# Altium PCB Sensor.PcbDoc
Units mm, origin at the board's own origin, x right, y up, seen from the top; angles counter-clockwise.
Board outline 24 x 18 mm, 2 copper layers (Top Layer, Bottom Layer); 16 components, 16 nets, 56 pads, 30 vias.
Unrouted connection lines stored in the file: 11.
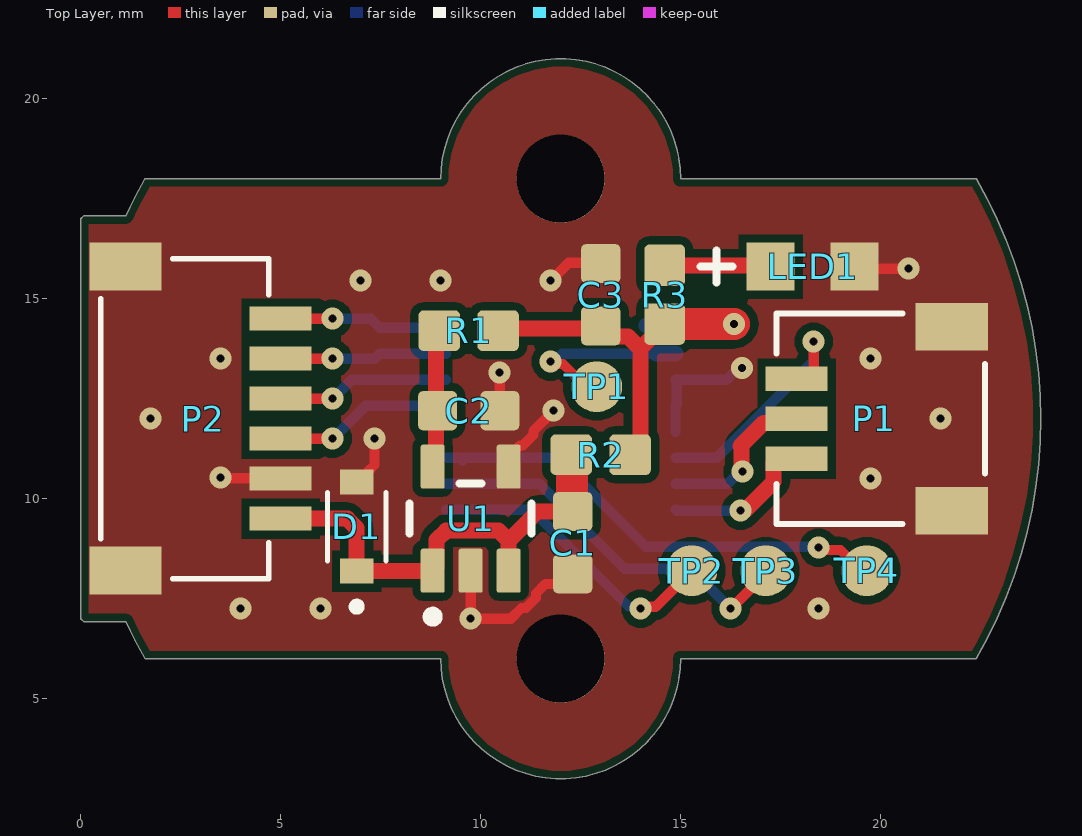
[diagram p0: Top Layer view]
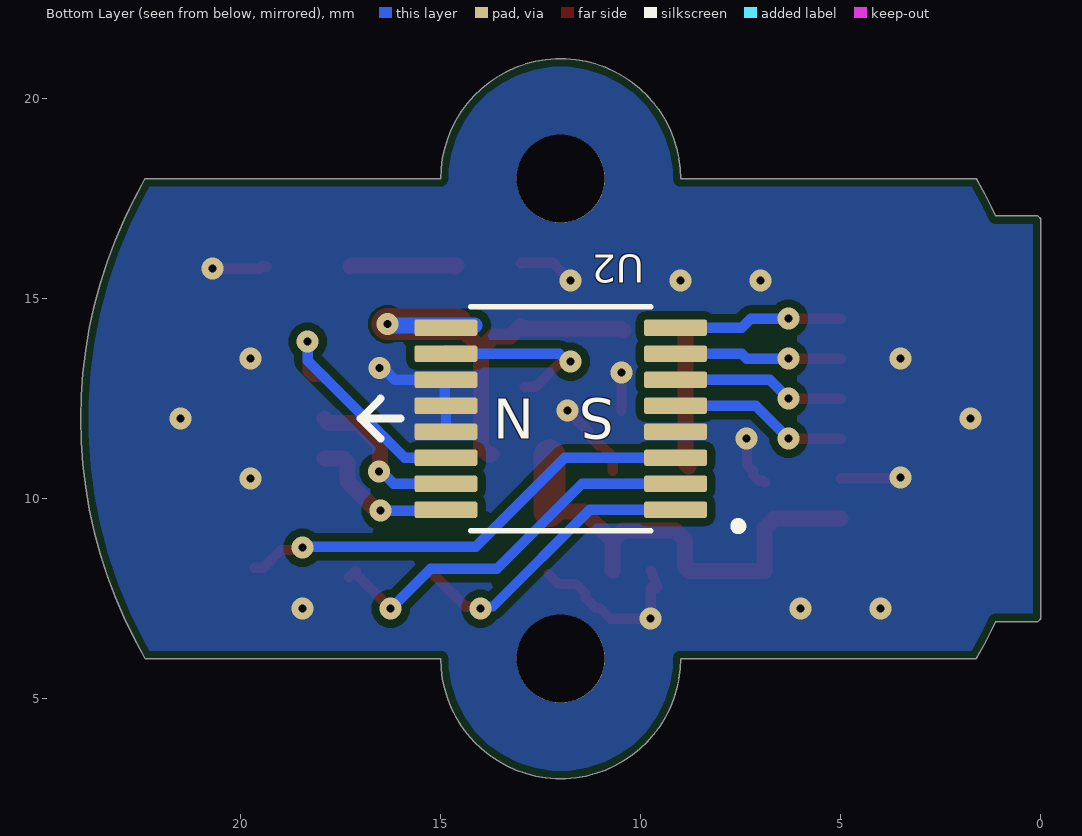
[diagram p1: Bottom Layer view, seen from below]
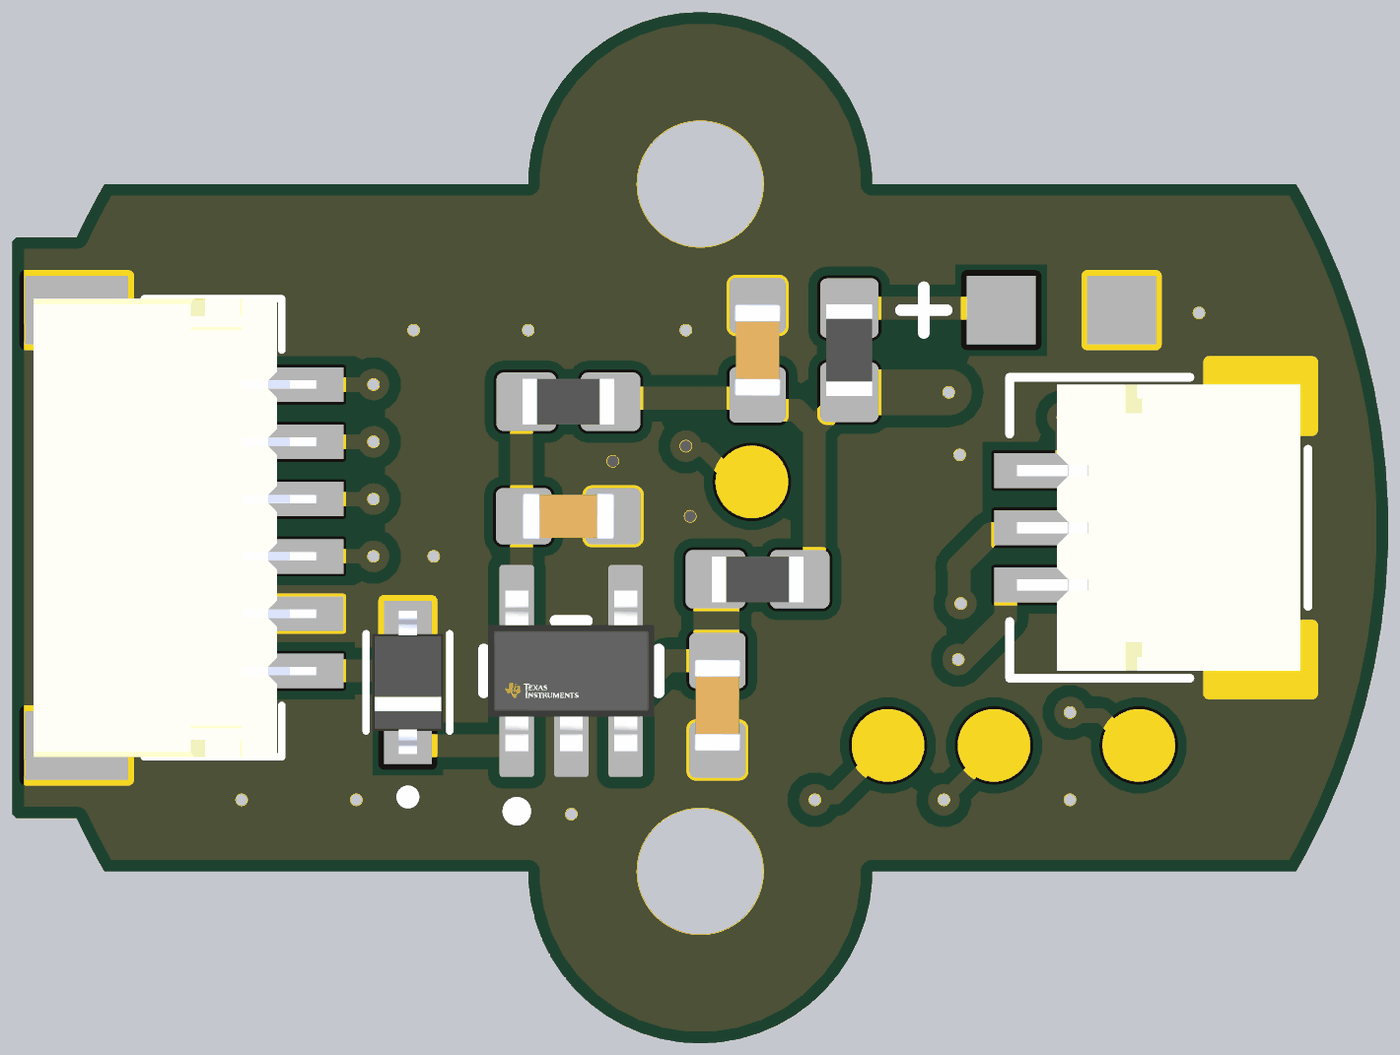
[diagram p2: 3D render of the assembled board from above, using the file's embedded part models]

## Layer stack, top to bottom
Top Solder: solder mask 0.0102, Solder Resist, Dk 3.5
Top Layer: signal copper 0.0356
Dielectric 1: dielectric 0.32, FR-4, Dk 4.8
Bottom Layer: signal copper 0.0356
Bottom Solder: solder mask 0.0102, Solder Resist, Dk 3.5

## Board outline
0.071,6.929 0,7 0,17 0.071,17.071 1.124,17.071 cw(c12,12) 1.608,18 9,18 cw(c12,18) 15,18 22.392,18 cw(c12,12) 24,12 cw(c12,12) 22.392,6 15,6 cw(c12,6) 9,6 1.608,6 cw(c12,12) 1.124,6.929

## Design rules (kind name [scope] priority, off if disabled: settings)
BoardOutlineClearance [All] p1: gap=0.2 ignorepadtopadclearanceinfootprint=FALSE except(0: Arc-SplitContinuation Track-SplitContinuation SMDPad-SplitContinuation THPad-SplitContinuation Via-SplitContinuation Fill-SplitContinuation Poly-SplitContinuation Region-SplitContinuation Text-SplitContinuation)
Clearance [All] p1: gap=0.2 ignorepadtopadclearanceinfootprint=FALSE except(0: Arc-Hole Track-Hole SMDPad-Hole THPad-Hole Via-Hole Fill-Hole Poly-Hole Region-Hole Text-Hole)
PolygonConnect [All] p1: connectstyle=Direct reliefconductorwidth=0.254 reliefentries=4 polygonreliefangle="90 Angle" airgapwidth=0.254
RoutingVias [All] p1: holewidth=0.2 width=0.55 viastyle="Through Hole" minholewidth=0.2 minwidth=0.55 maxholewidth=0.2 maxwidth=0.55
SilkToSolderMaskClearance [IsPad] p1: minsilkscreentomaskgap=0.1 clearancetoexposedcopper=TRUE
SolderMaskExpansion [All] p1: expansion=0.102 istentingtop=FALSE
Width [All] p1: maxlimit=0.8 minlimit=0.254 preferedwidth=0.4 minimp=50.000000 maximp=50.000000 favimp=50.000000
29 further rules are at their usual default settings.

## Components (designator, comment, footprint, x,y, rotation, side; value= is the part's Value field where it differs from the comment)
C1 "1uF" CAPC1608X90N 12.3,8.9 r90 top
C2 "1uF" CAPC1608X90N 9.7,12.2 r180 top
C3 "100nF" CAPC1608X90N 13,15.1 r90 top
D1 "SD05" DIO_MM3Z3V0T1G 6.9,9.3 r90 top
LED1 "0805 Red LED" LED0805 18.3,15.8 r0 top
P1 "SM03B-SRSS-TB" CONN_SM03B-SRSS-TB_JST 20,12 r90 top
P2 "SM06B-SRSS-TB" SM06B-SRSS-TB 3,12 r270 top
R1 "0R" RESC1607X60N 9.7,14.2 r0 top
R2 "0R" RESC1607X60N 13,11.1 r0 top
R3 "1k" RESC1607X60N 14.6,15.1 r270 top
TP1 "50mil TEST_PAD" 15mil_TEST_PAD 12.9,12.8 r0 top
TP2 "50mil TEST_PAD" 15mil_TEST_PAD 15.275,8.2 r0 top
TP3 "50mil TEST_PAD" 15mil_TEST_PAD 17.125,8.2 r0 top
TP4 "50mil TEST_PAD" 15mil_TEST_PAD 19.65,8.2 r0 top
U1 "TPS7A2033PDBVR" FP-DBV0005A-MFG 9.75,9.5 r90 top
U2 "MT6835GT-STD" MT6835GT-STD 12,12 r0 bottom

## Footprints (in the part's own frame and the unit in brackets; to place one, negate y for a bottom-side part, rotate by r counter-clockwise, add the part's x,y. Pads: shape width x height; smd on the part's side, far side on the other; paste and mask are expansions set on the pad)
15mil_TEST_PAD [mm]
  round 1.27 smd paste-2539.97 mask+0.051: 1(0,0)
CAPC1608X90N [mm]
  rrect25% 0.972x0.981 smd mask+0.051: 1(-0.78,0) 2(0.78,0)
  body extent -0.8,-0.4 0.8,0.4, height 0.9
CONN_SM03B-SRSS-TB_JST [mil]
  rect 24x61 smd paste+0 mask+2: 1(-39.37,82.68) 2(0,82.68) 3(39.37,82.68)
  rect 47x71 smd paste-35.5 mask+4: 4(-90.55,-69.88) 5(90.55,-69.88)
  silkscreen extent -103,-102 103,102, body extent -98,-97 98,98, height 116
DIO_MM3Z3V0T1G [mm]
  rect 0.625x0.83 smd: A(1.112,0) K(-1.112,0)
  silkscreen extent -2.1,-0.73 0.85,0.73, body extent -1.25,-0.62 1.25,0.62, height 1
FP-DBV0005A-MFG [mm]
  rrect17% 1.1x0.6 smd paste+0 mask+0: 1(-1.3,0.95) 2(-1.3,0) 3(-1.3,-0.95) 4(1.3,-0.95) 5(1.3,0.95)
  silkscreen extent -2.57,-1.53 0.87,1.53, body extent -1.95,-1.78 1.95,1.78, height 0.25
LED0805 [mm]
  rect 1.2x1.2 smd: 1(-1.05,0) 2(1.05,0)
  silkscreen extent -2.8,-0.4 -2,0.4, body extent -1,-0.65 1,0.65, height 0.8
MT6835GT-STD [mm]
  rrect25% 1.57x0.41 smd mask+0.152: 1(-2.87,2.275) 2(-2.87,1.625) 3(-2.87,0.975) 4(-2.87,0.325) 5(-2.87,-0.325) 6(-2.87,-0.975) 7(-2.87,-1.625) 8(-2.87,-2.275) 9(2.87,-2.275) 10(2.87,-1.625) 11(2.87,-0.975) 12(2.87,-0.325) 13(2.87,0.325) 14(2.87,0.975) 15(2.87,1.625) 16(2.87,2.275)
  silkscreen extent -4.54,-2.8 5,2.8, body extent -3.15,-2.5 3.15,2.5, height 1
RESC1607X60N [mm]
  rrect25% 1.04x1.02 smd mask+0.051: 1(-0.735,0) 2(0.735,0)
  body extent -0.8,-0.4 0.8,0.4, height 0.55
SM06B-SRSS-TB [mm]
  rect 0.6x1.55 smd mask+0.051: 1(-2.5,2) 2(-1.5,2) 3(-0.5,2) 4(0.5,2) 5(1.5,2) 6(2.5,2)
  rect 1.2x1.8 smd: P-MOUNT1(-3.8,-1.875) P-MOUNT2(3.8,-1.875)
  silkscreen extent -4,-2.5 4,1.7, body extent -4,-2.63 4,2.32, height 2.95

## Part data
C1 C2: library part C0603C105K4RACAUTO, "Ceramic Capacitor, Multilayer, Ceramic, 16V, 10% +Tol, 10% -Tol, X7R, 15% TC, 1uF, Surface Mount, 0603", Capacitance=1µF, Case/Package=0603, Dielectric=X7R, Dielectric Material=Ceramic, Manufacturer=KEMET, Max Operating Temperature=125°C, Min Operating Temperature=-55°C, Tolerance=10%, Voltage Rating=16V, Category="Ceramic Capacitors", China RoHS=Compliant, ComponentLink1Description=https://datasheet.octopart.com:443/C0603C105K4RACAUTO-KEMET-datasheet-170281384.pdf?src-supplier=IHS, ComponentLink1URL=https://datasheet.octopart.com:443/C0603C105K4RACAUTO-KEMET-datasheet-170281384.pdf?src-supplier=IHS, ComponentLink2Description=https://datasheet.octopart.com:443/C0603C105K4RACAUTO-KEMET-datasheet-138896278.pdf?src-supplier=Newark, ComponentLink2URL=https://datasheet.octopart.com:443/C0603C105K4RACAUTO-KEMET-datasheet-138896278.pdf?src-supplier=Newark, ComponentLink3Description=https://datasheet.octopart.com:443/C0603C105K4RACAUTO-KEMET-datasheet-153410967.pdf?src-supplier=Electro+Sonic, ComponentLink3URL=https://datasheet.octopart.com:443/C0603C105K4RACAUTO-KEMET-datasheet-153410967.pdf?src-supplier=Electro+Sonic, ComponentLink4Description=https://datasheet.octopart.com/C0603C105K4RACAUTO-KEMET-datasheet-84169754.pdf, ComponentLink4URL=https://datasheet.octopart.com/C0603C105K4RACAUTO-KEMET-datasheet-84169754.pdf, Height=800µm, Length=1.6mm, Lifecycle Status=Production, Manufacturer Part Number=C0603C105K4RACAUTO, Material=Ceramic, Mount="Surface Mount", Number of Terminals=2, Packaging="Tape & Reel", Pricing 1="1=0.12, 10=0.069, 50=0.048, 100=0.0416, 500=0.0309, 1000=0.02761 (USD)", REACH SVHC=Yes, RoHS=Compliant, Schedule B=8532240020, Stock 1=247588, Supplier 1=DigiKey, Voltage Rating (DC)=16V, Width=800µm
C3: library part C0603C104K5RACTU, "Capacitor, Ceramic, Multilayer, 50 V, X7R, 0.1 Uf, Surface Mount, 0603", Case Code (Imperial)=0603, Dielectric=X7R, Dielectric Material=Ceramic, Manufacturer=KEMET, Max Operating Temperature=125°C, Min Operating Temperature=-55°C, Temperature Coefficient=30ppm/°C, Tolerance=10%, Voltage=50V, Capacitance=100nF, Case/Package=0603, Category="Ceramic Capacitors", China RoHS=Compliant, ComponentLink1Description=https://datasheet.octopart.com:443/C0603C104K5RACTU-KEMET-datasheet-178445679.pdf?src-supplier=IHS, ComponentLink1URL=https://datasheet.octopart.com:443/C0603C104K5RACTU-KEMET-datasheet-178445679.pdf?src-supplier=IHS, ComponentLink2Description=https://datasheet.octopart.com:443/C0603C104K5RAC7867-KEMET-datasheet-184792804.pdf?src-supplier=IHS, ComponentLink2URL=https://datasheet.octopart.com:443/C0603C104K5RAC7867-KEMET-datasheet-184792804.pdf?src-supplier=IHS, ComponentLink3Description=https://datasheet.octopart.com:443/C0603C104K5RACTU-KEMET-datasheet-137357759.pdf?src-supplier=Farnell, ComponentLink3URL=https://datasheet.octopart.com:443/C0603C104K5RACTU-KEMET-datasheet-137357759.pdf?src-supplier=Farnell, ComponentLink4Description=https://datasheet.octopart.com:443/C0603C104K5RACTU-KEMET-datasheet-149521864.pdf?src-supplier=Farnell, ComponentLink4URL=https://datasheet.octopart.com:443/C0603C104K5RACTU-KEMET-datasheet-149521864.pdf?src-supplier=Farnell, ComponentLink5Description=https://datasheet.octopart.com:443/C0603C104K5RACTU-KEMET-datasheet-101575654.pdf?src-supplier=Farnell, ComponentLink5URL=https://datasheet.octopart.com:443/C0603C104K5RACTU-KEMET-datasheet-101575654.pdf?src-supplier=Farnell, ComponentLink6Description=https://datasheet.octopart.com:443/C0603C104K5RACTU-KEMET-datasheet-176142159.pdf?src-supplier=Farnell, ComponentLink6URL=https://datasheet.octopart.com:443/C0603C104K5RACTU-KEMET-datasheet-176142159.pdf?src-supplier=Farnell, ComponentLink7Description=https://datasheet.octopart.com:443/C0603C104K5RAC-TU-Kemet-datasheet-7833651.pdf?src-supplier=Farnell, ComponentLink7URL=https://datasheet.octopart.com:443/C0603C104K5RAC-TU-Kemet-datasheet-7833651.pdf?src-supplier=Farnell, ComponentLink8Description=https://datasheet.octopart.com:443/C0603C104K5RAC-TU-Kemet-datasheet-7601896.pdf?src-supplier=Farnell, ComponentLink8URL=https://datasheet.octopart.com:443/C0603C104K5RAC-TU-Kemet-datasheet-7601896.pdf?src-supplier=Farnell, ComponentLink9Description=https://datasheet.octopart.com:443/C0603C104K5RAC-TU-Kemet-datasheet-5316294.pdf?src-supplier=Farnell, ComponentLink9URL=https://datasheet.octopart.com:443/C0603C104K5RAC-TU-Kemet-datasheet-5316294.pdf?src-supplier=Farnell, ComponentLink10Description=https://datasheet.octopart.com:443/C0603C104K5RAC-TU-Kemet-datasheet-5314837.pdf?src-supplier=Farnell, ComponentLink10URL=https://datasheet.octopart.com:443/C0603C104K5RAC-TU-Kemet-datasheet-5314837.pdf?src-supplier=Farnell, ComponentLink11Description=https://datasheet.octopart.com:443/C0603C104K5RAC-TU-Kemet-datasheet-8092359.pdf?src-supplier=Farnell, ComponentLink11URL=https://datasheet.octopart.com:443/C0603C104K5RAC-TU-Kemet-datasheet-8092359.pdf?src-supplier=Farnell, ComponentLink12Description=https://datasheet.octopart.com:443/C0603C104K5RAC-TU-Kemet-datasheet-5314449.pdf?src-supplier=Farnell, ComponentLink12URL=https://datasheet.octopart.com:443/C0603C104K5RAC-TU-Kemet-datasheet-5314449.pdf?src-supplier=Farnell, ComponentLink13Description=https://datasheet.octopart.com:443/C0603C104K5RAC-TU-Kemet-datasheet-5314969.pdf?src-supplier=Farnell, ComponentLink13URL=https://datasheet.octopart.com:443/C0603C104K5RAC-TU-Kemet-datasheet-5314969.pdf?src-supplier=Farnell, ComponentLink14Description=https://datasheet.octopart.com:443/C0603C104K5RAC-TU-Kemet-datasheet-5314627.pdf?src-supplier=Farnell, ComponentLink14URL=https://datasheet.octopart.com:443/C0603C104K5RAC-TU-Kemet-datasheet-5314627.pdf?src-supplier=Farnell, ComponentLink15Description=https://datasheet.octopart.com:443/C0603C104K5RAC-TU-Kemet-datasheet-5389132.pdf?src-supplier=Farnell, ComponentLink15URL=https://datasheet.octopart.com:443/C0603C104K5RAC-TU-Kemet-datasheet-5389132.pdf?src-supplier=Farnell, ComponentLink16Description=https://datasheet.octopart.com:443/C0603C104K5RAC-TU-Kemet-datasheet-5313836.pdf?src-supplier=Farnell, ComponentLink16URL=https://datasheet.octopart.com:443/C0603C104K5RAC-TU-Kemet-datasheet-5313836.pdf?src-supplier=Farnell, ComponentLink17Description=https://datasheet.octopart.com:443/C0603C104K5RAC-TU-Kemet-datasheet-8111010.pdf?src-supplier=Farnell, ComponentLink17URL=https://datasheet.octopart.com:443/C0603C104K5RAC-TU-Kemet-datasheet-8111010.pdf?src-supplier=Farnell, ComponentLink18Description=https://datasheet.octopart.com:443/C0603C104K5RAC-TU-Kemet-datasheet-7627733.pdf?src-supplier=Farnell, ComponentLink18URL=https://datasheet.octopart.com:443/C0603C104K5RAC-TU-Kemet-datasheet-7627733.pdf?src-supplier=Farnell, ComponentLink19Description=https://datasheet.octopart.com:443/C0603C104K5RAC-TU-Kemet-datasheet-5315946.pdf?src-supplier=Farnell, ComponentLink19URL=https://datasheet.octopart.com:443/C0603C104K5RAC-TU-Kemet-datasheet-5315946.pdf?src-supplier=Farnell, ComponentLink20Description=https://datasheet.octopart.com:443/C0603C104K5RACTU-KEMET-datasheet-137357764.pdf?src-supplier=Upverter, ComponentLink20URL=https://datasheet.octopart.com:443/C0603C104K5RACTU-KEMET-datasheet-137357764.pdf?src-supplier=Upverter, ComponentLink21Description=https://datasheet.octopart.com:443/C0603C104K5RAC-TU-Kemet-datasheet-5313890.pdf?src-supplier=Newark, ComponentLink21URL=https://datasheet.octopart.com:443/C0603C104K5RAC-TU-Kemet-datasheet-5313890.pdf?src-supplier=Newark, ComponentLink22Description=https://datasheet.octopart.com:443/C0603C104K5RACTU-Kemet-datasheet-12608295.pdf?src-supplier=Newark, ComponentLink22URL=https://datasheet.octopart.com:443/C0603C104K5RACTU-Kemet-datasheet-12608295.pdf?src-supplier=Newark, ComponentLink23Description=https://datasheet.octopart.com:443/C0603C104K5RACTU-Kemet-datasheet-11992184.pdf?src-supplier=Newark, ComponentLink23URL=https://datasheet.octopart.com:443/C0603C104K5RACTU-Kemet-datasheet-11992184.pdf?src-supplier=Newark, ComponentLink24Description=https://datasheet.octopart.com:443/C0603C104K5RACTU-Kemet-datasheet-10942409.pdf?src-supplier=Newark, ComponentLink24URL=https://datasheet.octopart.com:443/C0603C104K5RACTU-Kemet-datasheet-10942409.pdf?src-supplier=Newark, ComponentLink25Description=https://datasheet.octopart.com:443/C0603C104K5RACTU-Kemet-datasheet-10404442.pdf?src-supplier=Newark, ComponentLink25URL=https://datasheet.octopart.com:443/C0603C104K5RACTU-Kemet-datasheet-10404442.pdf?src-supplier=Newark, ComponentLink26Description=https://datasheet.octopart.com:443/C0603C104K5RAC-TU-Kemet-datasheet-5390537.pdf?src-supplier=Newark, ComponentLink26URL=https://datasheet.octopart.com:443/C0603C104K5RAC-TU-Kemet-datasheet-5390537.pdf?src-supplier=Newark, ComponentLink27Description=https://datasheet.octopart.com:443/C0603C104K5RAC-TU-Kemet-datasheet-7541751.pdf?src-supplier=Newark, ComponentLink27URL=https://datasheet.octopart.com:443/C0603C104K5RAC-TU-Kemet-datasheet-7541751.pdf?src-supplier=Newark, ComponentLink28Description=https://datasheet.octopart.com:443/C0603C104K5RACTU-KEMET-datasheet-171829795.pdf?src-supplier=Newark, ComponentLink28URL=https://datasheet.octopart.com:443/C0603C104K5RACTU-KEMET-datasheet-171829795.pdf?src-supplier=Newark, ComponentLink29Description=https://datasheet.octopart.com:443/C0603C104K5RACTU-Kemet-datasheet-8764837.pdf?src-supplier=Newark, ComponentLink29URL=https://datasheet.octopart.com:443/C0603C104K5RACTU-Kemet-datasheet-8764837.pdf?src-supplier=Newark, ComponentLink30Description=https://datasheet.octopart.com:443/C0603C104K5RACTU-Kemet-datasheet-8480123.pdf?src-supplier=Newark, ComponentLink30URL=https://datasheet.octopart.com:443/C0603C104K5RACTU-Kemet-datasheet-8480123.pdf?src-supplier=Newark, ComponentLink31Description=https://datasheet.octopart.com:443/C0603C104K5RACTU-Kemet-datasheet-5393970.pdf?src-supplier=Newark, ComponentLink31URL=https://datasheet.octopart.com:443/C0603C104K5RACTU-Kemet-datasheet-5393970.pdf?src-supplier=Newark, ComponentLink32Description=https://datasheet.octopart.com:443/C0603C104K5RACTU-Kemet-datasheet-8502025.pdf?src-supplier=Newark, ComponentLink32URL=https://datasheet.octopart.com:443/C0603C104K5RACTU-Kemet-datasheet-8502025.pdf?src-supplier=Newark, ComponentLink33Description=https://datasheet.octopart.com:443/C0603C104K5RACTU-Kemet-datasheet-161801.pdf?src-supplier=Newark, ComponentLink33URL=https://datasheet.octopart.com:443/C0603C104K5RACTU-Kemet-datasheet-161801.pdf?src-supplier=Newark, ComponentLink34Description=https://datasheet.octopart.com:443/C0603C104K5RACTU-Kemet-datasheet-32036385.pdf?src-supplier=Electro+Sonic, ComponentLink34URL=https://datasheet.octopart.com:443/C0603C104K5RACTU-Kemet-datasheet-32036385.pdf?src-supplier=Electro+Sonic, ComponentLink35Description=https://datasheet.octopart.com:443/C0603C104K5RACTU-KEMET-datasheet-157246124.pdf?src-supplier=Electro+Sonic, ComponentLink35URL=https://datasheet.octopart.com:443/C0603C104K5RACTU-KEMET-datasheet-157246124.pdf?src-supplier=Electro+Sonic, ComponentLink36Description=https://datasheet.octopart.com:443/C0603C104K5RACTU-KEMET-datasheet-164512540.pdf?src-supplier=TME, ComponentLink36URL=https://datasheet.octopart.com:443/C0603C104K5RACTU-KEMET-datasheet-164512540.pdf?src-supplier=TME, ComponentLink37Description=https://datasheet.octopart.com:443/C0603C104K5RACTU-Kemet-datasheet-67830781.pdf?src-supplier=TME, ComponentLink37URL=https://datasheet.octopart.com:443/C0603C104K5RACTU-Kemet-datasheet-67830781.pdf?src-supplier=TME, ComponentLink38Description=https://datasheet.octopart.com:443/C0603C104K5RACTU-KEMET-datasheet-68331906.pdf?src-supplier=TME, ComponentLink38URL=https://datasheet.octopart.com:443/C0603C104K5RACTU-KEMET-datasheet-68331906.pdf?src-supplier=TME, ComponentLink39Description=https://datasheet.octopart.com:443/C0603C104K5RAC7867-Kemet-datasheet-62098571.pdf?src-supplier=TME, ComponentLink39URL=https://datasheet.octopart.com:443/C0603C104K5RAC7867-Kemet-datasheet-62098571.pdf?src-supplier=TME, ComponentLink40Description=https://datasheet.octopart.com:443/C0603C104K5RAC7867-Kemet-datasheet-17577222.pdf?src-supplier=TME, ComponentLink40URL=https://datasheet.octopart.com:443/C0603C104K5RAC7867-Kemet-datasheet-17577222.pdf?src-supplier=TME, ComponentLink41Description=https://datasheet.octopart.com:443/C0603C104K5RACTU-KEMET-datasheet-110724412.pdf?src-supplier=RS+(Formerly+Allied+Electronics), ComponentLink41URL=https://datasheet.octopart.com:443/C0603C104K5RACTU-KEMET-datasheet-110724412.pdf?src-supplier=RS+(Formerly+Allied+Electronics), ComponentLink42Description=https://datasheet.octopart.com:443/C0603C104K5RACTU-Kemet-datasheet-464.pdf?src-supplier=RS+(Formerly+Allied+Electronics), ComponentLink42URL=https://datasheet.octopart.com:443/C0603C104K5RACTU-Kemet-datasheet-464.pdf?src-supplier=RS+(Formerly+Allied+Electronics), ComponentLink43Description=https://datasheet.octopart.com/C0603C104K5RACTU-KEMET-datasheet-84169754.pdf, ComponentLink43URL=https://datasheet.octopart.com/C0603C104K5RACTU-KEMET-datasheet-84169754.pdf, ComponentLink44Description=https://datasheet.octopart.com:443/C0603C104K5RACTU-Kemet-datasheet-24570007.pdf?src-supplier=element14+APAC, ComponentLink44URL=https://datasheet.octopart.com:443/C0603C104K5RACTU-Kemet-datasheet-24570007.pdf?src-supplier=element14+APAC, ComponentLink45Description=https://datasheet.octopart.com:443/C0603C104K5RACTU-Kemet-datasheet-22084244.pdf?src-supplier=element14+APAC, ComponentLink45URL=https://datasheet.octopart.com:443/C0603C104K5RACTU-Kemet-datasheet-22084244.pdf?src-supplier=element14+APAC, ComponentLink46Description=https://datasheet.octopart.com:443/C0603C104K5RACTU-Kemet-datasheet-21389238.pdf?src-supplier=element14+APAC, ComponentLink46URL=https://datasheet.octopart.com:443/C0603C104K5RACTU-Kemet-datasheet-21389238.pdf?src-supplier=element14+APAC, ComponentLink47Description=https://datasheet.octopart.com:443/C0603C104K5RACTU-Kemet-datasheet-11723057.pdf?src-supplier=Arrow+Electronics, ComponentLink47URL=https://datasheet.octopart.com:443/C0603C104K5RACTU-Kemet-datasheet-11723057.pdf?src-supplier=Arrow+Electronics, ComponentLink48Description=https://datasheet.octopart.com:443/C0603C104K5RAC7867-KEMET-datasheet-164857143.pdf?src-supplier=Burklin+Elektronik, ComponentLink48URL=https://datasheet.octopart.com:443/C0603C104K5RAC7867-KEMET-datasheet-164857143.pdf?src-supplier=Burklin+Elektronik, ComponentLink49Description=https://datasheet.octopart.com:443/C0603C104K5RAC-TU-Kemet-datasheet-8187850.pdf?src-supplier=Jameco, ComponentLink49URL=https://datasheet.octopart.com:443/C0603C104K5RAC-TU-Kemet-datasheet-8187850.pdf?src-supplier=Jameco, ComponentLink50Description=https://datasheet.octopart.com:443/C0603C104K5RACTU-Kemet-datasheet-122295.pdf?src-supplier=DigiKey, ComponentLink50URL=https://datasheet.octopart.com:443/C0603C104K5RACTU-Kemet-datasheet-122295.pdf?src-supplier=DigiKey, Contact Plating=Tin, Depth=800µm, Dissipation Factor=2.5%, Height=800µm, Lead Free="Lead Free", Lead Pitch=700µm, Length=1.6mm, Lifecycle Status=Production, Manufacturer Part Number=C0603C104K5RACTU, Material=Ceramic, Mount="Surface Mount", Number of Pins=2, Number of Terminals=2, Packaging="Tape & Reel", Pricing 1="1=0.08, 10=0.011 (USD)", Radiation Hardening=No, REACH SVHC=Yes, RoHS=Compliant, Schedule B="8532240020, 8532240020|8532240020, 8532240020|8532240020|8532240020, 8532240020|8532240020|8532240020|8532240020", Stock 1=6705630, Supplier 1=DigiKey, Termination=SMD/SMT, Thickness=863.6µm, Voltage Rating=50V, Voltage Rating (DC)=50V, Width=800µm
D1: "Trans Voltage Suppressor Diode, 350W, 5V V(RWM), Unidirectional, 1 Element, Silicon", Clamping Voltage=14.5V, Manufacturer="Sangdest Microelectronics", Max Operating Temperature=125°C, Min Breakdown Voltage=6V, Min Operating Temperature=-55°C, Peak Pulse Power=350W, Peak Reverse Current=10µA, Reverse Standoff Voltage=5V, Supplier Part Number 1=1655-SD05CT-ND, Category="TVS Diodes", ComponentLink1Description=https://datasheet.octopart.com:443/SD05-SMC-Diode-Solutions-datasheet-181400473.pdf?src-supplier=IHS, ComponentLink1URL=https://datasheet.octopart.com:443/SD05-SMC-Diode-Solutions-datasheet-181400473.pdf?src-supplier=IHS, Lifecycle Status=Production, Manufacturer Part Number=SD05, Number of Elements=1, Number of Terminals=2, Polarity=Unidirectional, Pricing 1="1=0.27, 10=0.165, 100=0.1025, 500=0.0752, 1000=0.06636 (USD)", REACH SVHC=Yes, RoHS=Compliant, Stock 1=13210, Supplier 1=DigiKey
LED1: library part "LS R976-NR-1-0-20-R18", "LED Uni-Color Red 645nm 2-Pin Chip 0805(2012Metric) T/R", Manufacturer="Osram Opto", Supplier Part Number 1=475-LSR976-NR-1CT-ND, Category=LEDs, Manufacturer Part Number="LS R976-NR-1-0-20-R18", Pricing 1="1=0.15, 10=0.102, 100=0.0704, 500=0.05582, 1000=0.05095, 2000=0.04679 (USD)", Schedule B="8541402000, 8541402000|8541402000, 8541402000|8541402000|8541402000, 8541402000|8541402000|8541402000|8541402000", Stock 1=110240, Supplier 1=DigiKey
P1: "Board Connector, 3 Contact(s), 1 Row(s), Male, Right Angle, Surface Mount Terminal", Color=Natural, Manufacturer=JST, Max Operating Temperature=85°C, Min Operating Temperature=-25°C, Category="Card Edge Connectors", ComponentLink1Description=https://datasheet.octopart.com:443/SM03B-SRSS-TB-JST-datasheet-180492086.pdf?src-supplier=IHS, ComponentLink1URL=https://datasheet.octopart.com:443/SM03B-SRSS-TB-JST-datasheet-180492086.pdf?src-supplier=IHS, ComponentLink2Description=https://datasheet.octopart.com:443/SM03B-SRSS-TB-JST-datasheet-44103209.pdf?src-supplier=TME, ComponentLink2URL=https://datasheet.octopart.com:443/SM03B-SRSS-TB-JST-datasheet-44103209.pdf?src-supplier=TME, ComponentLink3Description=https://datasheet.octopart.com:443/SM03B-SRSS-TB-JST-datasheet-118603.pdf?src-supplier=DigiKey, ComponentLink3URL=https://datasheet.octopart.com:443/SM03B-SRSS-TB-JST-datasheet-118603.pdf?src-supplier=DigiKey, ComponentLink4Description=https://datasheet.octopart.com:443/SM03B-SRSS-TB-JST-datasheet-152738602.pdf?src-supplier=Amar+Radio+Corporation, ComponentLink4URL=https://datasheet.octopart.com:443/SM03B-SRSS-TB-JST-datasheet-152738602.pdf?src-supplier=Amar+Radio+Corporation, Connector Type="Male Pin", Contact Gender=Male, Contact Plating=Tin, Housing Color=Natural, Housing Material=Nylon, Lead Free="Contains Lead", Lifecycle Status=Obsolete, Manufacturer Part Number=SM03B-SRSS-TB, Mount="Surface Mount", Number of Contacts=3, Number of Pins=3, Number of Positions=3, Number of Rows=1, Orientation=Horizontal, Pitch=990.6µm, Pricing 1="1=0.44, 10=0.373, 100=0.317, 500=0.2829, 1000=0.26938 (USD)", RoHS=Compliant, Stock 1=14167, Supplier 1=DigiKey, Terminal Pitch=1mm, Termination=Solder
P2: "Board Connector, 6 Contact(s), 1 Row(s), Male, Right Angle, 0.039 inch Pitch, Surface Mount Terminal", Color=Natural, Dielectric Material=Polyamide, Manufacturer=JST, Max Operating Temperature=85°C, Min Operating Temperature=-25°C, Category="Card Edge Connectors", ComponentLink1Description=https://datasheet.octopart.com:443/SM06B-SRSS-TB-JST-datasheet-118603.pdf?src-supplier=Upverter, ComponentLink1URL=https://datasheet.octopart.com:443/SM06B-SRSS-TB-JST-datasheet-118603.pdf?src-supplier=Upverter, ComponentLink2Description=https://datasheet.octopart.com:443/SM06B-SRSS-TB-JST-datasheet-180492086.pdf?src-supplier=IHS, ComponentLink2URL=https://datasheet.octopart.com:443/SM06B-SRSS-TB-JST-datasheet-180492086.pdf?src-supplier=IHS, ComponentLink3Description=https://datasheet.octopart.com:443/SM06B-SRSS-TB-JST-datasheet-44103209.pdf?src-supplier=TME, ComponentLink3URL=https://datasheet.octopart.com:443/SM06B-SRSS-TB-JST-datasheet-44103209.pdf?src-supplier=TME, ComponentLink4Description=https://datasheet.octopart.com:443/SM06B-SRSS-TB-JST-datasheet-152738602.pdf?src-supplier=Amar+Radio+Corporation, ComponentLink4URL=https://datasheet.octopart.com:443/SM06B-SRSS-TB-JST-datasheet-152738602.pdf?src-supplier=Amar+Radio+Corporation, Connector Type="Male Pin", Contact Gender=Male, Contact Plating=Tin, Housing Color=Natural, Housing Material=Nylon, Lead Free="Contains Lead", Lifecycle Status=Obsolete, Manufacturer Package Identifier=SM06B-SRSS-TB, Manufacturer Part Number=SM06B-SRSS-TB, Mount="Surface Mount", Number of Contacts=6, Number of Pins=6, Number of Positions=6, Number of Rows=1, Orientation=Horizontal, Pitch=990.6µm, Pricing 1="1=0.67, 10=0.567, 100=0.4821, 500=0.43024, 1000=0.40969 (USD)", RoHS=Compliant, Stock 1=26532, Supplier 1=DigiKey, Terminal Pitch=1mm, Termination=Solder
R1 R2: library part RC0402JR-070RL, "GENERAL PURPOSE CHIP RESISTOR Metal Glaze/thick Film, 0.0625W, 0ohm, Surface Mount, 0402", Case Code (Imperial)=0402, Manufacturer="Yageo Group", Max Operating Temperature=155°C, Max Power Dissipation=63mW, Min Operating Temperature=-55°C, Power Dissipation=62.5mW, Resistance=0Ω, Supplier Part Number 1=311-0.0JRTR-ND, Temperature Coefficient=200ppm/°C, Tolerance=5%, Voltage Rating=50V, Case/Package=0402, Category="Chip SMD Resistors", China RoHS=Non-Compliant, ComponentLink1Description=https://datasheet.octopart.com:443/RC0402JR-070RL-Yageo-datasheet-182189538.pdf?src-supplier=IHS, ComponentLink1URL=https://datasheet.octopart.com:443/RC0402JR-070RL-Yageo-datasheet-182189538.pdf?src-supplier=IHS, ComponentLink2Description=https://datasheet.octopart.com:443/RC0402JR-070RL-Yageo-datasheet-10408619.pdf?src-supplier=Newark, ComponentLink2URL=https://datasheet.octopart.com:443/RC0402JR-070RL-Yageo-datasheet-10408619.pdf?src-supplier=Newark, ComponentLink3Description=https://datasheet.octopart.com:443/RC0402JR-070RL-Yageo-datasheet-12531192.pdf?src-supplier=Seeed+Studio, ComponentLink3URL=https://datasheet.octopart.com:443/RC0402JR-070RL-Yageo-datasheet-12531192.pdf?src-supplier=Seeed+Studio, ComponentLink4Description=https://datasheet.octopart.com:443/RC0402JR-070RL-Yageo-datasheet-8324527.pdf?src-supplier=TME, ComponentLink4URL=https://datasheet.octopart.com:443/RC0402JR-070RL-Yageo-datasheet-8324527.pdf?src-supplier=TME, ComponentLink5Description=https://datasheet.octopart.com:443/RC0402JR-070RL-Yageo-datasheet-62067350.pdf?src-supplier=Farnell, ComponentLink5URL=https://datasheet.octopart.com:443/RC0402JR-070RL-Yageo-datasheet-62067350.pdf?src-supplier=Farnell, ComponentLink6Description=https://datasheet.octopart.com:443/RC0402JR-070RL-Yageo-datasheet-8329306.pdf?src-supplier=element14, ComponentLink6URL=https://datasheet.octopart.com:443/RC0402JR-070RL-Yageo-datasheet-8329306.pdf?src-supplier=element14, ComponentLink7Description=https://datasheet.octopart.com:443/RC0402JR-070RL-Yageo-datasheet-505231.pdf?src-supplier=element14, ComponentLink7URL=https://datasheet.octopart.com:443/RC0402JR-070RL-Yageo-datasheet-505231.pdf?src-supplier=element14, ComponentLink8Description=https://datasheet.octopart.com:443/RC0402JR-070RL-Yageo-datasheet-175423674.pdf?src-supplier=SOS+electronic, ComponentLink8URL=https://datasheet.octopart.com:443/RC0402JR-070RL-Yageo-datasheet-175423674.pdf?src-supplier=SOS+electronic, ComponentLink9Description=https://datasheet.octopart.com:443/RC0402JR-070RL-Yageo-datasheet-164759695.pdf?src-supplier=Future+Electronics, ComponentLink9URL=https://datasheet.octopart.com:443/RC0402JR-070RL-Yageo-datasheet-164759695.pdf?src-supplier=Future+Electronics, ComponentLink10Description=https://datasheet.octopart.com:443/RC0402JR-070RL-Yageo-datasheet-137700087.pdf?src-supplier=Future+Electronics, ComponentLink10URL=https://datasheet.octopart.com:443/RC0402JR-070RL-Yageo-datasheet-137700087.pdf?src-supplier=Future+Electronics, ComponentLink11Description=https://datasheet.octopart.com/RC0402JR-070RL-Yageo-datasheet-73766026.pdf, ComponentLink11URL=https://datasheet.octopart.com/RC0402JR-070RL-Yageo-datasheet-73766026.pdf, ComponentLink12Description=http://sigma.octopart.com:80/rohs_statement/Yageo-company-2.pdf?src-supplier=Compliance+Statements, ComponentLink12URL=http://sigma.octopart.com:80/rohs_statement/Yageo-company-2.pdf?src-supplier=Compliance+Statements, ComponentLink13Description=http://sigma.octopart.com:80/conflict_mineral_statement/Yageo-company-3.pdf?src-supplier=Compliance+Statements, ComponentLink13URL=http://sigma.octopart.com:80/conflict_mineral_statement/Yageo-company-3.pdf?src-supplier=Compliance+Statements, Composition="Thick Film", Contact Plating=Tin, Depth=500µm, Features="Moisture Resistant", Height=350µm, Lead Free="Lead Free", Length=1mm, Lifecycle Status=Production, Manufacturer Part Number=RC0402JR-070RL, Military Standard=Not, Mount="Surface Mount", Number of Pins=2, Number of Terminals=2, Number of Terminations=2, Packaging="Tape & Reel", Power Rating=63mW, Pricing 1="10000=0.00206, 20000=0.00185, 30000=0.00175, 50000=0.00163, 70000=0.00155, 100000=0.00148, 120000=0.00145, 240000=0.00134, 250000=0.00133 (USD)", Radiation Hardening=No, REACH SVHC=Yes, RoHS=Compliant, Schedule B="8533290000, 8533290000|8533290000, 8533290000|8533290000|8533290000, 8533290000|8533290000|8533290000|8533290000", Stock 1=19862441, Supplier 1=DigiKey, Termination=SMD/SMT, Voltage Rating (DC)=50V, Width=500µm
R3: library part RNCP0603FTD1K00, "Fixed Resistor, Thin Film, 0.125W, 1000ohm, 150V, 1% +/-Tol, 100ppm/Cel, Surface Mount, 0603", Case Code (Imperial)=0603, Case Code (Metric)=1608, Manufacturer="Stackpole Electronics", Max Operating Temperature=155°C, Max Power Dissipation=125mW, Min Operating Temperature=-55°C, Resistance=1kΩ, Temperature Coefficient=100ppm/°C, Tolerance=1%, Voltage Rating=150V, Case/Package=0603, Category="Chip SMD Resistors", ComponentLink1Description=https://datasheet.octopart.com:443/RNCP0603FTD1K00-Stackpole-Electronics-datasheet-182148179.pdf?src-supplier=IHS, ComponentLink1URL=https://datasheet.octopart.com:443/RNCP0603FTD1K00-Stackpole-Electronics-datasheet-182148179.pdf?src-supplier=IHS, ComponentLink2Description=https://datasheet.octopart.com:443/RNCP0603FTD1K00-Stackpole-Electronics-datasheet-149178200.pdf?src-supplier=Upverter, ComponentLink2URL=https://datasheet.octopart.com:443/RNCP0603FTD1K00-Stackpole-Electronics-datasheet-149178200.pdf?src-supplier=Upverter, ComponentLink3Description=https://datasheet.octopart.com:443/RNCP0603FTD1K00-Stackpole-Electronics-datasheet-141193801.pdf?src-supplier=Stackpole+Electronics, ComponentLink3URL=https://datasheet.octopart.com:443/RNCP0603FTD1K00-Stackpole-Electronics-datasheet-141193801.pdf?src-supplier=Stackpole+Electronics, ComponentLink4Description=https://datasheet.octopart.com:443/RNCP0603FTD1K00-Stackpole-Electronics-datasheet-38896780.pdf?src-supplier=Stackpole+Electronics, ComponentLink4URL=https://datasheet.octopart.com:443/RNCP0603FTD1K00-Stackpole-Electronics-datasheet-38896780.pdf?src-supplier=Stackpole+Electronics, ComponentLink5Description=https://datasheet.octopart.com:443/RNCP0603FTD1K00-Stackpole-Electronics-datasheet-33021030.pdf?src-supplier=Future+Electronics, ComponentLink5URL=https://datasheet.octopart.com:443/RNCP0603FTD1K00-Stackpole-Electronics-datasheet-33021030.pdf?src-supplier=Future+Electronics, ComponentLink6Description=https://datasheet.octopart.com:443/RNCP0603FTD1K00-Stackpole-Electronics-datasheet-12527267.pdf?src-supplier=Future+Electronics, ComponentLink6URL=https://datasheet.octopart.com:443/RNCP0603FTD1K00-Stackpole-Electronics-datasheet-12527267.pdf?src-supplier=Future+Electronics, ComponentLink7Description=http://sigma.octopart.com:80/15942470/materials_sheet/Stackpole-Electronics-RNCP0603FTD1K00.pdf?src-supplier=Compliance+Statements, ComponentLink7URL=http://sigma.octopart.com:80/15942470/materials_sheet/Stackpole-Electronics-RNCP0603FTD1K00.pdf?src-supplier=Compliance+Statements, ComponentLink8Description=http://sigma.octopart.com:80/141158211/reach_statement/Stackpole-Electronics-RNCP0603FTD1K00.pdf?src-supplier=Compliance+Statements, ComponentLink8URL=http://sigma.octopart.com:80/141158211/reach_statement/Stackpole-Electronics-RNCP0603FTD1K00.pdf?src-supplier=Compliance+Statements, ComponentLink9Description=http://sigma.octopart.com:80/141158212/rohs_statement/Stackpole-Electronics-RNCP0603FTD1K00.pdf?src-supplier=Compliance+Statements, ComponentLink9URL=http://sigma.octopart.com:80/141158212/rohs_statement/Stackpole-Electronics-RNCP0603FTD1K00.pdf?src-supplier=Compliance+Statements, Composition="Thin Film", Features="Anti-Sulfur, Moisture Resistant", Height=400µm, Length=1.4986mm, Lifecycle Status=Production, Manufacturer Part Number=RNCP0603FTD1K00, Mount="Surface Mount", Number of Terminals=2, Number of Terminations=2, Packaging=Digi-Reel®, Power Dissipation=125mW, Power Rating=125mW, Pricing 1="1=0.1, 10=0.010, 25=0.010, 50=0.0096, 100=0.0089, 250=0.0084, 500=0.00792 (USD)", REACH SVHC=Yes, RoHS=Compliant, Schedule B="8533210045, 8533210045|8533210045, 8533210045|8533210045|8533210045, 8533210045|8533210045|8533210045|8533210045", Stock 1=341429, Supplier 1=DigiKey, Width=800µm, Working Voltage=150V
TP1 TP2 TP3 TP4: library part "15mil TEST_PAD"
U1: "300mA ultra-low-noise low-IQ low-dropout (LDO) linear regulator with high PSRR 5-SOT-23 -40 to 125", Case/Package=SOT-23-5, Dropout Voltage=145mV, Manufacturer="Texas Instruments", Manufacturer Lifecycle Status=ACTIVE, Max Junction Temperature (Tj)=125°C, Max Supply Voltage=6V, Min Operating Temperature=-40°C, Min Supply Voltage=1.6V, Nominal Supply Current=6.5µA, Output Current=300mA, Output Voltage=3.3V, Supplier Part Number 1=296-TPS7A2033PDBVRDKR-ND, Accuracy=1.5%, Category="LDO Voltage Regulators", ComponentLink1Description=https://sigma.octopart.com:443/177332311/technical_drawing/Texas-Instruments-TPS7A2033PDBVR.pdf?src-supplier=Texas+Instruments, ComponentLink1URL=https://sigma.octopart.com:443/177332311/technical_drawing/Texas-Instruments-TPS7A2033PDBVR.pdf?src-supplier=Texas+Instruments, ComponentLink2Description=https://octopart.com:443/opatz8j6/c1?t=jI4MJxUHNHWPLUTUjPFE_I4nFT9ogQQS70wFg6iEODFO8LbYHvqBDKPBMlDtEwO4fNGI88ubVwCkCjf0m79oYyvw0lNgXSr_kQlB_nshs-lDL0gpQEt062WpfwVbrY7aMcaNfk_VYcVu1c5ZyMHT8tYLznoJcMs0V3cIKOpV8FkTUbmZxBhaArT7MSQXB5rB175PQ9HeqkODOBcAb5uxQ4pXmdIRVFW0nHjT5bbTxbLCkHYQ6wSbjOTmjpzrmMdRq376bhW5SzS0L0ZYTijf2l1mplZ7KrrI9CUmQvcyMNcVPe6befGlNnr1fDH3Q5Ss6aSm6FD-UpaqOnEuIpR4XaVo6xK0ksEziWk1rzqOuekfSo_fNioOtoDqTgyhaxobMR58zb0N&src-supplier=Texas+Instruments, ComponentLink2URL=https://octopart.com:443/opatz8j6/c1?t=jI4MJxUHNHWPLUTUjPFE_I4nFT9ogQQS70wFg6iEODFO8LbYHvqBDKPBMlDtEwO4fNGI88ubVwCkCjf0m79oYyvw0lNgXSr_kQlB_nshs-lDL0gpQEt062WpfwVbrY7aMcaNfk_VYcVu1c5ZyMHT8tYLznoJcMs0V3cIKOpV8FkTUbmZxBhaArT7MSQXB5rB175PQ9HeqkODOBcAb5uxQ4pXmdIRVFW0nHjT5bbTxbLCkHYQ6wSbjOTmjpzrmMdRq376bhW5SzS0L0ZYTijf2l1mplZ7KrrI9CUmQvcyMNcVPe6befGlNnr1fDH3Q5Ss6aSm6FD-UpaqOnEuIpR4XaVo6xK0ksEziWk1rzqOuekfSo_fNioOtoDqTgyhaxobMR58zb0N&src-supplier=Texas+Instruments, ComponentLink3Description=https://sigma.octopart.com:443/175570406/technical_drawing/Texas-Instruments-TPS7A2033PDBVR.pdf?src-supplier=Texas+Instruments, ComponentLink3URL=https://sigma.octopart.com:443/175570406/technical_drawing/Texas-Instruments-TPS7A2033PDBVR.pdf?src-supplier=Texas+Instruments, ComponentLink4Description=https://sigma.octopart.com:443/169406034/technical_drawing/Texas-Instruments-TPS7A2033PDBVR.pdf?src-supplier=Texas+Instruments, ComponentLink4URL=https://sigma.octopart.com:443/169406034/technical_drawing/Texas-Instruments-TPS7A2033PDBVR.pdf?src-supplier=Texas+Instruments, ComponentLink5Description=https://sigma.octopart.com:443/155939316/technical_drawing/Texas-Instruments-TPS7A2033PDBVR.pdf?src-supplier=Texas+Instruments, ComponentLink5URL=https://sigma.octopart.com:443/155939316/technical_drawing/Texas-Instruments-TPS7A2033PDBVR.pdf?src-supplier=Texas+Instruments, ComponentLink6Description=https://datasheet.octopart.com:443/TPS7A2033PDBVR-Texas-Instruments-datasheet-149070019.pdf?src-supplier=Upverter, ComponentLink6URL=https://datasheet.octopart.com:443/TPS7A2033PDBVR-Texas-Instruments-datasheet-149070019.pdf?src-supplier=Upverter, ComponentLink7Description=https://datasheet.octopart.com:443/TPS7A2033PDBVR-Texas-Instruments-datasheet-164420832.pdf?src-supplier=Augswan, ComponentLink7URL=https://datasheet.octopart.com:443/TPS7A2033PDBVR-Texas-Instruments-datasheet-164420832.pdf?src-supplier=Augswan, ComponentLink8Description=https://datasheet.octopart.com:443/TPS7A2033PDBVR-Texas-Instruments-datasheet-159781690.pdf?src-supplier=LCSC, ComponentLink8URL=https://datasheet.octopart.com:443/TPS7A2033PDBVR-Texas-Instruments-datasheet-159781690.pdf?src-supplier=LCSC, ComponentLink9Description=http://sigma.octopart.com:80/reach_statement/Texas-Instruments-company-64.pdf?src-supplier=Compliance+Statements, ComponentLink9URL=http://sigma.octopart.com:80/reach_statement/Texas-Instruments-company-64.pdf?src-supplier=Compliance+Statements, ComponentLink10Description=http://sigma.octopart.com:80/conflict_mineral_statement/Texas-Instruments-company-63.pdf?src-supplier=Compliance+Statements, ComponentLink10URL=http://sigma.octopart.com:80/conflict_mineral_statement/Texas-Instruments-company-63.pdf?src-supplier=Compliance+Statements, Height=1.45mm, Length=2.9mm, Lifecycle Status=Production, Manufacturer Part Number=TPS7A2033PDBVR, Max Operating Temperature=125°C, Number of Channels=1, Number of Outputs=1, Number of Pins=5, Pricing 1="1=0.33, 10=0.225, 25=0.1992, 100=0.1715, 250=0.15828, 500=0.15028, 1000=0.14369 (USD)", RoHS=Compliant, Stock 1=57995, Supplier 1=DigiKey, Thickness=1.2mm, Width=1.6mm
U2: "SPI TSSOP-16 Angle, Linear Position Measuring RoHS", Current - Supply=22mA, Manufacturer="Magn Tek", Operating Temperature=-40℃~+125℃, Package=TSSOP-16, Supplier Part Number=C2932578, Voltage - Supply=3V~5.5V, Category=Sensors, Features="Angle nonlinearity compensation;Self-calibration;Zero position programming;Fault diagnosis", Interface=SPI, Manufacturer Part Number=MT6835GT-STD, Supplier 1=LCSC

## Free pads (board coordinates)
  round 2.2 hole 2.2 mask+0: 2(12,6) 2(12,18)

## Via types
v1: diameter 0.55, hole 0.2, Top Layer to Bottom Layer, tented both sides, 30 vias

## Nets (pads, with @x,y where several pads share a name; then routed paths per layer and width w, separated by ;. In a path a pad name is that pad's centre, name@x,y a point inside that pad or via, vN(x,y) a via of type N, cw(c..) or ccw(c..) an arc to the next point about the centre after c; other vN are vias at no path point)
A: P1.1 U2.16 | length 3.9
  Top Layer w0.4: v1(16.5,9.7) 16.6,9.7 17.325,10.425 17.325,10.895 17.43,11 P1.1
  Bottom Layer w0.254: U2.16 14.895,9.7 v1(16.5,9.7)
B: P1.2 U2.15 | length 4.1
  Top Layer w0.4: v1(16.546,10.677) 16.517,10.706 16.517,11.304 16.5,11.322 17.074,11.895 17.795,11.895 P1.2
  Bottom Layer w0.254: U2.15 16.175,10.375 16.477,10.677 v1(16.546,10.677)
CSN: P2.1 U2.8 | length 4.2
  Top Layer w0.254: P2.1 v1(6.3,14.5)
  Bottom Layer w0.254: v1(6.3,14.5) 7.25,14.5 7.475,14.275 U2.8
GND: C1.1 C2.1 C3.2 D1.A LED1.2 P1.4 P1.5 P2.5 P2.P-MOUNT1 P2.P-MOUNT2 pad.2 U1.2 U1.4 U2.4 U2.11 U2.12 U2.13 | length 16.3
  Top Layer w0.254: v1(3.5,10.525) 3.512,10.513 4.987,10.513 P2.5 ; D1.A 6.912,10.412 6.95,10.45 7.04,10.45 7.188,10.598 7.188,10.688 7.344,10.844 7.344,11.494 v1(7.35,11.5) ; U1.2 9.577,7.777 9.75,7.777 v1(9.75,7) 10.75,7 11.019,7.269 11.128,7.269 11.381,7.522 11.381,7.631 11.617,7.867 12.047,7.867 C1.1 ; v1(10.475,13.161) 10.478,13.158 10.478,12.303 10.475,12.3 10.48,12.295 C2.1 ; U1.4 10.7,10.7 10.7,11.05 10.979,11.329 11.052,11.329 11.321,11.597 11.321,11.696 v1(11.825,12.2) ; v1(11.75,15.45) 12.2,15.9 12.95,15.9 12.97,15.88 C3.2 ; LED1.2 19.425,15.8 19.45,15.825 19.525,15.75 v1(20.7,15.75)
  Bottom Layer w0.254: U2.13 U2.12 14.9,12.355 U2.11@14.9,12.945 ; U2.11 U2.11@14.9,12.945 ; v1(16.527,13.271) 16.446,13.271 16.15,12.975 14.93,12.975 U2.11@14.9,12.945
  other v1: 4,7.25 6,7.25 18.45,7.25 19.75,10.5 1.75,12 21.5,12 3.5,13.5 19.75,13.5 7,15.45 9,15.45
LED: LED1.1 R3.1 | length 2.7
  Top Layer w0.4: R3.1 14.635,15.8 14.67,15.835 17.215,15.835 LED1.1
MISO: P2.4 U2.5 | length 4.5
  Top Layer w0.254: P2.4 v1(6.3,11.5)
  Bottom Layer w0.254: v1(6.3,11.5) 7.125,12.325 U2.5
MOSI: P2.3 U2.6 | length 4.3
  Top Layer w0.254: P2.3 v1(6.3,12.5)
  Bottom Layer w0.254: v1(6.3,12.5) 6.775,12.975 U2.6
PWM: TP1.1 U2.10 | length 4.6
  Top Layer w0.254: v1(11.75,13.425) 11.807,13.368 12.057,13.368 12.625,12.8 TP1.1
  Bottom Layer w0.254: v1(11.75,13.425) 11.83,13.425 12.03,13.625 U2.10@14.35,13.625
  Bottom Layer w0.4: U2.10@14.4,13.625 U2.10
SCK: P2.2 U2.7 | length 4.2
  Top Layer w0.254: P2.2 v1(6.3,13.5)
  Bottom Layer w0.254: v1(6.3,13.5) 7.35,13.5 7.475,13.625 U2.7
U: TP2.1 U2.1 | length 7.7
  Top Layer w0.254: v1(14,7.25) 14.047,7.297 14.372,7.297 TP2.1
  Bottom Layer w0.254: U2.1 11.275,9.725 13.693,7.307 14.087,7.307 v1@14.115,7.278
V: TP3.1 U2.2 | length 10
  Top Layer w0.254: v1(16.25,7.25) 17.125,8.125 TP3.1 TP3.1@17.296,8.029
  Bottom Layer w0.254: U2.2 11.47,10.375 13.595,8.25 15.25,8.25 v1(16.25,7.25)
VCC: C1.2 D1.K P2.6 R2.1 U1.1 U1.3 | length 11.9
  Top Layer w0.4: P2.6 6.666,9.5 6.9,9.266 D1.K 6.906,8.194 U1.1@8.794,8.194 ; U1.1 8.899,8.299 8.899,8.97 9.133,9.204 10.446,9.204 10.7,8.95 ; U1.3 10.7,8.95 ; R2.1 R2.1@12.283,11.083 ; C1.2@12.283,9.698 C1.2 11.43,9.68 10.7,8.95
  Top Layer w0.8: C1.2@12.283,9.698 R2.1@12.283,11.083
VDD: C3.1 R1.2 R2.2 R3.2 U2.9 | length 11.4
  Top Layer w0.4: R1.2 10.495,14.26 12.94,14.26 C3.1 13.27,14.05 13.683,14.05 13.989,13.744 ; R2.2 13.8,11.1 13.989,11.289 13.989,13.744 ; R3.2@14.6,14.355 13.989,13.744
  Top Layer w0.8: R3.2 v1(16.335,14.365)
  Bottom Layer w0.4: U2.9@14.15,14.336 16.306,14.336 v1(16.335,14.365)
VOUT: C2.2 R1.1 U1.5 | length 3.5
  Top Layer w0.4: U1.5 8.883,10.883 8.883,14.118 R1.1
W: TP4.1 U2.3 | length 11.7
  Top Layer w0.254: v1(18.45,8.775) 18.507,8.718 18.993,8.718 19.437,8.275 TP4.1@19.65,8.275
  Bottom Layer w0.254: U2.3 9.486,11.025 9.55,10.961 9.614,11.025 11.9,11.025 14.125,8.8 18.425,8.8 v1(18.45,8.775)
Z: P1.3 U2.14 | length 6.2
  Top Layer w0.254: P1.3 17.9,13.05 18.197,13.05 18.325,13.178 v1(18.325,13.925)
  Bottom Layer w0.254: U2.14 15.901,11.025 18.325,13.449 v1(18.325,13.925)

## Polygon pours and split planes (outlines as drawn)
GND on Bottom Layer "NONET_L-01_P-001" (solid, remove dead copper, pour order 0): 0,24 24,24 24,0 0,0
GND on Top Layer "NONET_L-01_P-001" (solid, pour order 1): 0,24 24,24 24,0 0,0

## Silkscreen, mask and mechanical layers (free items; w line width, h text height)
Mechanical 1:
  the board outline again, w0.2

## Text inside footprints (layer, text, board x,y; h text height)
U2: Bottom Overlay "S" at 10.667,12.5 h1 r180; Bottom Overlay "N" at 12.667,12.5 h1 r180